# Altium PCB BalanceCar_CCD_Base.PcbDoc
Units mm, origin at the board's own origin, x right, y up, seen from the top; angles counter-clockwise.
Board outline 99 x 60 mm, 2 copper layers (Top Layer, Bottom Layer); 19 components, 44 nets, 132 pads, 10 vias.
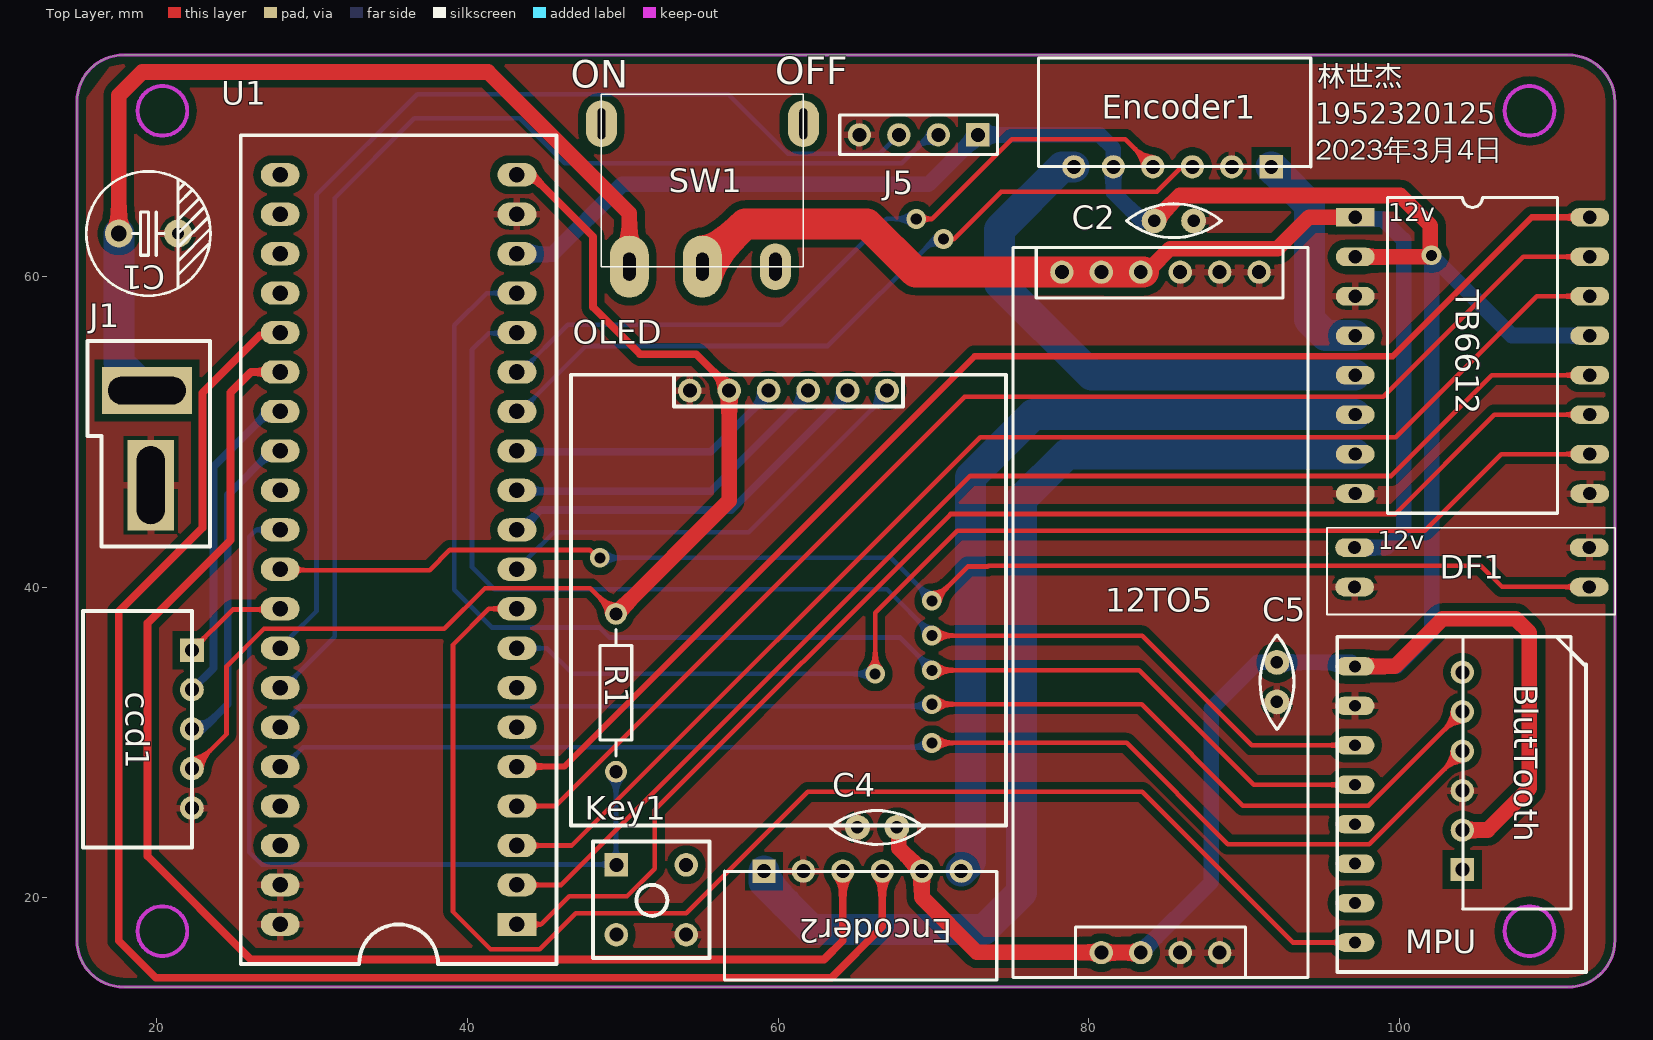
[diagram p0: Top Layer view]
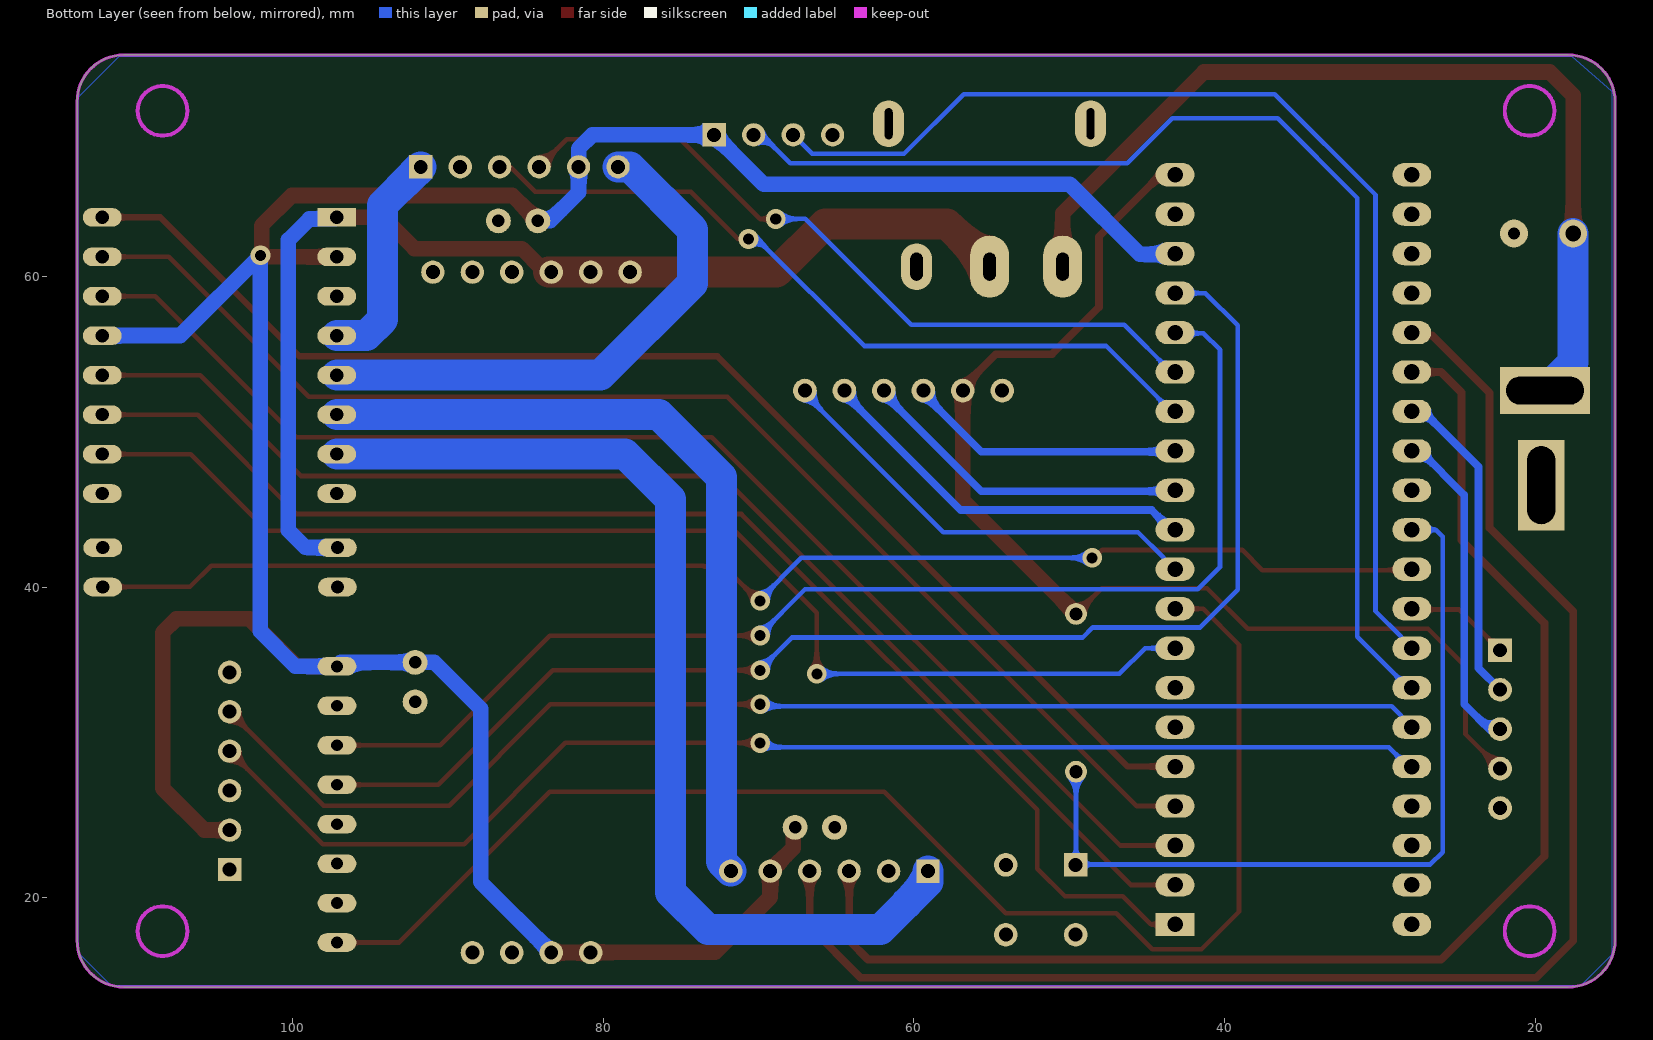
[diagram p1: Bottom Layer view, seen from below]

## Layer stack, top to bottom
Top Solder: solder mask 0.0102, Solder Resist, Dk 3.5
Top Layer: signal copper 0.0356
Dielectric1: dielectric 0.32, FR-4, Dk 4.8
Bottom Layer: signal copper 0.0356
Bottom Solder: solder mask 0.0102, Solder Resist, Dk 3.5

## Board outline
14.857,17.257 ccw(c17.857,17.257) 17.857,14.257 110.857,14.257 ccw(c110.857,17.257) 113.857,17.257 113.857,71.257 ccw(c110.857,71.257) 110.857,74.257 17.857,74.257 ccw(c17.857,71.257) 14.857,71.257
cut-out: 0,0 0.254,0 0.254,0.254 0,0.254

## Design rules (kind name [scope] priority, off if disabled: settings)
Clearance [All] p1: gap=0.254 ignorepadtopadclearanceinfootprint=FALSE
PlaneConnect [All] p1: planeconnectstyle=Relief reliefexpansion=0.508 reliefentries=4 reliefconductorwidth=0.454 reliefairgap=0.254
PolygonConnect [All] p1: connectstyle=Relief reliefconductorwidth=0.454 reliefentries=4 polygonreliefangle="90 Angle" airgapwidth=0.254
RoutingVias [All] p1: holewidth=0.6 width=1 viastyle="Through Hole" minholewidth=0.711 minwidth=1.27 maxholewidth=0.711 maxwidth=1.27
SolderMaskExpansion [All] p1: expansion=0.102 istentingtop=FALSE
Width [All] p1: maxlimit=2.5 minlimit=0.22 preferedwidth=1
29 further rules are at their usual default settings.

## Components (designator, comment, footprint, x,y, rotation, side; value= is the part's Value field where it differs from the comment)
12TO5 "稳压12T05" 稳压12T05 90.957,60.274 r270 top
BlutTooth "蓝牙模块" "HDR1X6 - XH弯" 104.038,21.819 r90 top
C1 "220uF35V" CAP-820uF-6.3V 17.551,62.763 r0 top
C2 "0.1UF" Cap-CP 86.741,63.576 r180 top
C4 "0.1UF" Cap-CP 65.1,24.536 r0 top
C5 "0.1UF" Cap-CP 92.1,32.614 r90 top
ccd1 "CCD巡线接口" CCD5 22.257,35.937 r270 top
DF1 "电池电压检测模块" "DF - 2" 97.104,42.545 r0 top
Encoder1 "右电机模块" "HDR1X6 - XH弯" 91.737,67.057 r180 top
Encoder2 "左电机模块" "HDR1X6 - XH弯" 59.08,21.717 r0 top
J1 "Header 2" "T HEAD" 19.611,46.561 r90 top
J5 "超声波接口" HDR1X4 72.847,69.113 r180 top
Key1 "SW-PB" KEY 49.323,21.869 r0 top
MPU "MPU6050模块" 6050new 108.376,26.264 r270 top
OLED "Header 6" OLED6 54.305,52.654 r0 top
R1 "Res2" AXIAL-0.4 49.555,33.198 r270 top value=10K
SW1 "SW-SPDT" SS12d11拨动电源开关 50.418,60.63 r0 top
TB6612 "电机驱动" TB6612DIP 97.143,63.805 r0 top
U1 "stm32f103c8t6" "PCBComponent_1 - duplicate" 43.18,18.288 r180 top

## Footprints (in the part's own frame and the unit in brackets; to place one, negate y for a bottom-side part, rotate by r counter-clockwise, add the part's x,y. Pads: shape width x height; smd on the part's side, far side on the other; paste and mask are expansions set on the pad)
6050new [mm]
  oval 1.2x2.5 hole 0.762: 1(-8.636,-11.246) 2(-6.096,-11.246) 3(-3.556,-11.246) 4(-1.016,-11.246)
  oval 1.2x2.5 hole 0.76: 5(1.524,-11.246) 6(4.064,-11.246) 7(6.604,-11.246) 8(9.144,-11.246)
  silkscreen extent -10.54,-12.39 11.05,3.61, body extent -9.91,-12.45 10.41,2.8, height 9.77
AXIAL-0.4 [mm] "Axial Device, Thru-Hole; 2 Leads; 0.4 in Pin Spacing"
  round 1.4 hole 0.85: 1(-5.08,0) 2(5.08,0)
  silkscreen extent -4.06,-1.02 4.06,1.02
CAP-820uF-6.3V [mm] "Φ8*11.5直插式电解电容"
  round 1.8 hole 1: 1(0,0)
  round 1.8 hole 0.8: 2(3.81,0)
  silkscreen extent -2.09,-4 5.9,4, body extent -1.97,-4.25 6.03,3.75, height 12
Cap-CP [mm] "直插型小瓷片电容"
  round 1.6 hole 0.8: 1(0,0) 2(2.54,0)
  silkscreen extent -1.78,-1.1 4.32,1.08, body extent -1.19,-0.51 3.73,0.59, height 4.76
CCD5 [mil]
  rect 60x60 hole 35.43: 1(0,0)
  round 60 hole 35.43: 2(100,0) 3(200,0) 4(300,0) 5(400,0)
  silkscreen extent -100,-276 500,0, body extent -90,-283 502,63, height 213
"DF - 2" [mm]
  oval 2.5x1.2 hole 0.85: 1(0,0) 2(0,-2.54) 3(15.1,-2.54) 4(15.1,0)
  silkscreen extent -1.78,-4.31 16.76,1.27, body extent -1.78,-4.32 16.76,1.27, height 8.2
HDR1X4 [mm] "Connector; Header; 4 Position"
  rect 1.5x1.5 hole 0.9: 1(0,0)
  round 1.5 hole 0.9: 2(2.54,0) 3(5.08,0) 4(7.62,0)
  silkscreen extent -1.27,-1.27 8.89,1.27, body extent -19.3,-18.29 26.42,0.07, height 27.41
"HDR1X6 - XH弯" [mm] "Connector; Header; 4 Position"
  rect 1.5x1.5 hole 0.9: 1(0,0)
  round 1.5 hole 0.9: 2(2.54,0) 3(5.08,0) 4(7.62,0) 5(10.16,0) 6(12.7,0)
  silkscreen extent -2.54,-7 14.99,0, body extent -2.39,-7.65 14.99,2.57, height 5.49
KEY [mil]
  rect 60x60 hole 35.43: 1(10,10)
  round 60 hole 35.43: 2(187.17,-167.17) 3(10,-167.17) 4(187.17,10)
  silkscreen extent -49,-226 246,69, body extent -80,-210 245,48, height 138
OLED6 [mil]
  round 60 hole 35.43: 1(0,0) 2(100,0) 3(200,0) 4(300,0) 5(400,0) 6(500,0)
  silkscreen extent -301,-1102 801,40, body extent -281,-1008 770,88, height 373
"PCBComponent_1 - duplicate" [mm]
  rect 2.5x1.5 hole 1: 1(0,0)
  oval 2.5x1.5 hole 1: 2(0,-2.54) 3(0,-5.08) 4(0,-7.62) 5(0,-10.16) 6(0,-12.7) 7(0,-15.24) 8(0,-17.78) 9(0,-20.32) 10(0,-22.86) 11(0,-25.4) 12(0,-27.94) 13(0,-30.48) 14(0,-33.02) 15(0,-35.56) 16(0,-38.1) 17(0,-40.64) 18(0,-43.18) 19(0,-45.72) 20(0,-48.26) 21(15.24,-48.26) 22(15.24,-45.72) 23(15.24,-43.18) 24(15.24,-40.64) 25(15.24,-38.1) 26(15.24,-35.56) 27(15.24,-33.02) 28(15.24,-30.48) 29(15.24,-27.94) 30(15.24,-25.4) 31(15.24,-22.86) 32(15.24,-20.32) 33(15.24,-17.78) 34(15.24,-15.24) 35(15.24,-12.7) 36(15.24,-10.16) 37(15.24,-7.62) 38(15.24,-5.08) 39(15.24,-2.54) 40(15.24,0)
  silkscreen extent -2.54,-50.8 17.78,2.54, body extent -3.23,-51.99 19.27,7.52, height 15.97
SS12d11拨动电源开关 [mm]
  oval 2x3 hole 0.5 slot 2 at 90 deg: 0(-1.8,9.2) 0(11.2,9.2)
  oval 2.5x4 hole 0.8 slot 1.8 at 90 deg: 1(0,0) 2(4.7,0)
  oval 2x3 hole 0.8 slot 1.8 at 90 deg: 3(9.4,0)
  silkscreen extent -1.8,0 11.2,11.1, body extent -1.77,-0.43 11.18,16.67, height 6.3
"T HEAD" [mm]
  rect 5.8x3 hole 1.8 slot 5 at 0 deg: 1(0,0)
  rect 3x5.8 hole 1.8 slot 5 at 90 deg: 2(6.096,0.254)
  silkscreen extent -3.94,-3.81 9.27,4.06, body extent -3.81,-3.81 9.14,4.06, height 10
TB6612DIP [mm]
  rect 2.5x1.2 hole 0.85: 1(0,0)
  oval 2.5x1.2 hole 0.85: 2(0,-2.54) 3(0,-5.08) 4(0,-7.62) 5(0,-10.16) 6(0,-12.7) 7(0,-15.24) 8(0,-17.78) 9(15.1,-17.78) 10(15.1,-15.24) 11(15.1,-12.7) 12(15.1,-10.16) 13(15.1,-7.62) 14(15.1,-5.08) 15(15.1,-2.54) 16(15.1,0)
  silkscreen extent 2.08,-19.05 13.02,1.27, body extent -2.83,-19.63 18.07,1.35, height 11.54
稳压12T05 [mm]
  round 1.5 hole 0.9: 1(0,0) 2(0,-2.54) 3(0,-5.08) 4(0,-7.62) 5(0,-10.16) 6(0,-12.7) 7(43.8,-10.16) 8(43.8,-7.62) 9(43.8,-5.08) 10(43.8,-2.54)
  silkscreen extent -1.6,-15.85 45.4,3.15, body extent -1.52,-15.75 45.21,3.05, height 20

## Part data
BlutTooth Encoder1 Encoder2: library part "Header 6", "不用焊", LatestRevisionDate=17-Jul-2002, LatestRevisionNote="Re-released for DXP Platform.", Publisher="Altium Limited"
C1: library part "CAPACITOR POL", "Capacitor"
C2 C4 C5: library part Cap, "Capacitor", LatestRevisionDate=17-Jul-2002, LatestRevisionNote="Re-released for DXP Platform.", PackageReference=RAD-0.3, Published=8-Jun-2000, Publisher="Altium Limited"
ccd1: library part "Header 5", "Header, 5-Pin", LatestRevisionDate=17-Jul-2002, LatestRevisionNote="Re-released for DXP Platform.", Publisher="Altium Limited"
DF1: library part 电阻分压测量电量
J1: "Header, 2-Pin", LatestRevisionDate=17-Jul-2002, LatestRevisionNote="Re-released for DXP Platform.", Publisher="Altium Limited"
J5: library part "Header 4", "Header, 4-Pin", LatestRevisionDate=17-Jul-2002, LatestRevisionNote="Re-released for DXP Platform.", Publisher="Altium Limited"
Key1: "Switch", LatestRevisionDate=17-Jul-2002, LatestRevisionNote="Re-released for DXP Platform.", PackageDescription="Switch; 2 Leads", PackageReference=SPST-2, Published=24-Mar-1999, Publisher="Altium Limited"
OLED: "Header, 6-Pin", LatestRevisionDate=17-Jul-2002, LatestRevisionNote="Re-released for DXP Platform.", Publisher="Altium Limited"
R1: "Resistor", LatestRevisionDate=17-Jul-2002, LatestRevisionNote="Re-released for DXP Platform.", PackageDescription="Axial Device, Thru-Hole; 2 Leads; 0.4 in Pin Spacing", PackageReference=AXIAL-0.4, Published=8-Jun-2000, Publisher="Altium Limited"
SW1: "单刀双掷开关"
TB6612: library part TB6612
U1: library part Component_1_1

## Via types
v1: diameter 1.27, hole 0.711, Top Layer to Bottom Layer, 10 vias

## Nets (pads, with @x,y where several pads share a name; then routed paths per layer and width w, separated by ;. In a path a pad name is that pad's centre, name@x,y a point inside that pad or via, vN(x,y) a via of type N, cw(c..) or ccw(c..) an arc to the next point about the centre after c; other vN are vias at no path point)
3.3V: U1.38
3V3: ccd1.4 OLED.2 R1.1 U1.20 | length 75.1
  Top Layer w0.3: ccd1.4 24.486,30.546 24.486,34.9 26.899,37.313 38.506,37.313 41.123,39.929 47.904,39.929 R1.1
  Top Layer w0.5: U1.20@43.357,66.497 43.498,66.357 44.286,66.357 48.082,62.56 48.082,58.016 51.107,54.991 54.724,54.991 OLED.2@57.057,52.657
  Top Layer w1: U1.20@43.129,66.548 43.307,66.548 U1.20@43.357,66.497 ; R1.1 56.845,45.568 OLED.2
5V: 12TO5.7 12TO5.8 BlutTooth.2 C2.2 C4.2 C5.2 Encoder1.5 Encoder2.5 J5.1 MPU.1 TB6612.2 TB6612.13 U1.18 | length 194.6
  Top Layer w1: C4.2 67.755,24.422 67.755,23.202 Encoder2.5 69.24,20.041 72.796,16.485 12TO5.7@81.102,16.485 ; 12TO5.7 12TO5.8 ; C2.2@84.125,63.5 C2.2 85.836,65.211 100.041,65.211 101.977,63.275 v1@101.977,61.35 ; MPU.1 99.7,34.9 102.757,37.957 107.477,37.957 108.357,37.077 108.357,27.057 105.659,24.359 BlutTooth.2@103.807,24.359 ; TB6612.2 101.892,61.265 v1@101.977,61.35 ; v1@101.977,61.277 v1@101.977,61.35 ; v1(102.057,61.357) 101.984,61.357 v1@101.977,61.35
  Bottom Layer w1: U1.18@43.18,61.417 45.441,61.417 49.962,65.938 69.672,65.938 J5.1 80.696,69.113 81.577,68.232 Encoder1.5 81.577,65.412 83.414,63.576 C2.2 ; 12TO5.8 87.884,21.021 87.884,32.182 90.856,35.154 C5.2 96.876,35.154 MPU.1 99.8,34.9 102.057,37.157 v1(102.057,61.357) 107.217,56.197 TB6612.13@112.243,56.197
12V: 12TO5.4 12TO5.5 12TO5.6 DF1.1 SW1.2 TB6612.1 | length 72.1
  Top Layer w1: 12TO5.4@83.515,60.274 83.65,60.274 83.9,60.524 83.958,60.524 85.222,61.789 92.142,61.789 94.17,63.817 TB6612.1@96.957,63.817
  Top Layer w2: SW1.2 57.872,63.384 65.724,63.384 68.824,60.285 78.562,60.285 12TO5.5@81.102,60.285 ; 12TO5.5@80.975,60.274 12TO5.4@83.515,60.274
  Bottom Layer w1: TB6612.1@96.97,63.805 TB6612.1 97.243,63.705 98.91,63.705 100.257,62.357 100.257,43.657 99.157,42.557 DF1.1@97.104,42.557
AO1: Encoder1.1 TB6612.4 | length 14.2
  Bottom Layer w2: Encoder1.1 94.199,64.595 94.199,57.215 95.217,56.197 TB6612.4@97.143,56.197
AO2: Encoder1.6 TB6612.5 | length 35.3
  Bottom Layer w2: Encoder1.6 78.279,67.057 74.257,63.035 74.257,59.557 80.157,53.657 97.13,53.657 TB6612.5
BO1: Encoder2.1 TB6612.7 | length 67.5
  Bottom Layer w2: Encoder2.1 59.08,21.031 62.154,17.957 73.257,17.957 75.657,20.357 75.657,45.657 78.577,48.577 TB6612.7@97.143,48.577
BO2: Encoder2.6 TB6612.6 | length 52
  Bottom Layer w2: Encoder2.6 72.39,22.327 72.39,47.09 76.417,51.117 TB6612.6@97.143,51.117
GND: 12TO5.1 12TO5.2 12TO5.3 12TO5.9 12TO5.10 BlutTooth.3 C1.2 C2.1 C4.1 C5.1 ccd1.5 DF1.2 DF1.4 Encoder1.2 Encoder2.2 J1.1 J5.4 Key1.2 MPU.2 OLED.1 TB6612.3 TB6612.8 TB6612.9 U1.19 U1.39 U1.40
NetJ1_2: C1.1 J1.2 SW1.1 | length 60.4
  Top Layer w1: C1.1 17.551,71.653 19.058,73.16 41.318,73.16 50.418,64.06 SW1.1
  Bottom Layer w2: C1.1 17.551,54.463 J1.2
PA0: Encoder2.4 U1.25 | length 99.2
  Top Layer w0.5: U1.25 27.749,56.197 26.631,56.197 22.936,52.502 22.936,43.815 17.551,38.43 17.551,17.247 19.937,14.861 63.426,14.861 66.7,18.136 Encoder2.4
PA1: Encoder2.3 U1.26 | length 88.2
  Top Layer w0.5: U1.26@27.889,53.848 26.06,53.848 24.74,52.527 24.74,43.028 19.406,37.694 19.406,22.682 26.054,16.034 62.948,16.034 64.16,17.247 Encoder2.3
PA2: ccd1.2 U1.27 | length 20.6
  Bottom Layer w0.5: ccd1.2 23.647,34.787 23.647,47.752 27.203,51.308 U1.27@27.889,51.308
PA3: ccd1.3 U1.28 | length 21.2
  Bottom Layer w0.5: ccd1.3 22.958,30.857 24.562,32.461 24.562,45.923 27.407,48.768 U1.28@27.889,48.768 ; U1.28@27.889,48.717 U1.28@28.117,48.717
PA4: U1.29
PA5: Key1.1 R1.2 U1.30 | length 52.6
  Bottom Layer w0.3: U1.30@27.889,43.688 26.391,43.688 25.959,43.256 25.959,22.936 26.746,22.149 Key1.1@49.555,22.149 ; Key1.1@49.555,22.145 R1.2 ; Key1.1@49.757,21.857 Key1.1@49.757,22.125
PA6: DF1.3 U1.31 | length 87.8
  Top Layer w0.3: U1.31@27.889,41.097 37.567,41.097 38.862,42.393 47.853,42.393 48.361,41.885 v1(48.514,41.885) ; v1(69.891,39.116) 70.002,39.116 72.212,41.326 73.482,41.326 73.533,41.377 105.232,41.377 106.591,40.017 DF1.3@112.204,40.017
  Bottom Layer w0.3: v1(48.514,41.885) 67.234,41.885 69.891,39.227 v1(69.891,39.116)
PA7: ccd1.1 U1.32 | length 6.7
  Top Layer w0.3: ccd1.1 24.877,38.557 U1.32@27.889,38.557
PA8: TB6612.16 U1.5 | length 83.8
  Top Layer w0.4: U1.5@43.129,28.448 46.228,28.448 72.637,54.857 99.557,54.857 108.505,63.805 TB6612.16
PA9: U1.6
PA10: U1.7
PA11: TB6612.10 U1.8 | length 78
  Top Layer w0.3: v1@66.117,34.417 v1(66.243,34.417) 66.243,38.354 71.526,43.637 101.625,43.637 106.553,48.565 TB6612.10
  Bottom Layer w0.3: U1.8 45.11,36.068 46.761,34.417 v1(66.243,34.417)
PA12: MPU.8 U1.9 | length 89.5
  Top Layer w0.3: U1.9 41.377,38.608 39.065,36.297 39.065,19.101 41.478,16.688 44.653,16.688 46.977,19.012 54.089,19.012 61.9,26.822 83.439,26.822 93.142,17.12 MPU.8
PA15: OLED.6 U1.10 | length 28.7
  Bottom Layer w0.3: U1.10 43.355,41.148 43.91,41.702 43.91,41.878 45.568,43.536 58.096,43.536 OLED.6@67.045,52.485
PB0: J5.3 U1.33 | length 72.5
  Bottom Layer w0.3: U1.33@27.889,36.068 28.064,36.068 28.619,36.622 28.619,36.798 30.277,38.456 30.277,65.253 36.758,71.734 56.79,71.734 60.63,67.894 66.548,67.894 J5.3
PB1: J5.2 U1.34 | length 76
  Bottom Layer w0.3: U1.34@28.029,33.389 31.445,36.805 31.445,65.049 36.576,70.18 43.357,70.18 46.253,67.285 67.945,67.285 69.774,69.113 J5.2
PB3: OLED.5 U1.11 | length 25.1
  Bottom Layer w0.5: U1.11 43.409,43.688 44.679,44.958 56.978,44.958 OLED.5@64.57,52.55
PB4: OLED.4 U1.12 | length 21.3
  Bottom Layer w0.5: U1.12@43.357,46.177 55.657,46.177 OLED.4@62.03,52.55
PB5: OLED.3 U1.13 | length 17.9
  Bottom Layer w0.5: U1.13@43.18,48.717 55.657,48.717 OLED.3@59.49,52.55
PB6: Encoder1.3 U1.14 | length 50.4
  Top Layer w0.3: v1(70.637,62.408) 71.298,62.408 74.346,65.456 84.379,65.456 85.98,67.057 Encoder1.3
  Bottom Layer w0.3: U1.14 U1.14@43.408,51.308 ; U1.14@43.357,51.257 U1.14@43.408,51.308 ; v1(70.637,62.408) 70.079,62.408 63.195,55.524 47.624,55.524 U1.14@43.408,51.308
  Bottom Layer w1: U1.14 43.129,51.257 U1.14@43.357,51.257
PB7: Encoder1.4 U1.15 | length 47.9
  Top Layer w0.3: v1(68.885,63.703) 69.905,63.703 75.035,68.834 82.341,68.834 Encoder1.4
  Bottom Layer w0.3: U1.15 43.408,53.848 46.456,56.896 60.173,56.896 66.98,63.703 v1(68.885,63.703)
PB8: MPU.3 U1.16 | length 79.1
  Top Layer w0.3: v1(69.891,36.881) 83.434,36.881 90.495,29.82 MPU.3
  Bottom Layer w0.3: U1.16@43.357,56.337 41.351,56.337 40.284,55.27 40.284,41.3 41.727,39.857 67,39.857 69.891,36.966 v1(69.891,36.881)
PB9: MPU.4 U1.17 | length 85.1
  Top Layer w0.3: v1(69.891,34.646) 83.236,34.646 90.602,27.28 MPU.4
  Bottom Layer w0.3: U1.17@43.129,58.928 41.224,58.928 39.141,56.845 39.141,39.827 41.565,37.403 48.488,37.403 49.137,36.754 67.843,36.754 69.891,34.706 v1(69.891,34.646)
PB10: BlutTooth.5 U1.35 | length 82.1
  Top Layer w0.3: v1(69.891,32.461) 83.388,32.461 89.916,25.933 97.993,25.933 BlutTooth.5
  Bottom Layer w0.3: U1.35@27.889,30.988 28.064,30.988 28.619,31.542 28.619,31.718 29.225,32.323 69.754,32.323 v1(69.891,32.461)
PB11: BlutTooth.4 U1.36 | length 81.9
  Top Layer w0.3: v1(69.891,29.972) 82.423,29.972 88.951,23.444 98.044,23.444 BlutTooth.4
  Bottom Layer w0.3: U1.36@28.029,28.309 29.413,29.693 69.35,29.693 69.629,29.972 v1(69.891,29.972)
PB12: TB6612.11 U1.1 | length 84.9
  Top Layer w0.3: U1.1@43.129,18.288 44.737,18.288 46.541,20.091 50.267,20.091 52.057,21.882 52.057,25.667 71.095,44.704 99.704,44.704 106.105,51.105 TB6612.11
PB13: TB6612.12 U1.2 | length 82.7
  Top Layer w0.3: U1.2@43.129,20.828 46.033,20.828 72.362,47.157 99.457,47.157 105.945,53.645 TB6612.12
PB14: TB6612.14 U1.3 | length 83.8
  Top Layer w0.3: U1.3@43.129,23.368 46.711,23.368 73,49.657 99.757,49.657 108.825,58.725 TB6612.14
PB15: TB6612.15 U1.4 | length 83.8
  Top Layer w0.3: U1.4@43.129,25.908 45.644,25.908 71.993,52.257 98.957,52.257 107.965,61.265 TB6612.15
PC13: U1.22
PC14: U1.23
PC15: U1.24
R: U1.37
VB: U1.21
pads on no net: BlutTooth.1 BlutTooth.6 Key1.3 Key1.4 MPU.5 MPU.6 MPU.7 SW1.0 SW1.3

## Polygon pours and split planes (outlines as drawn)
GND on Bottom Layer "NONET_L02_P001" (solid, remove dead copper, shelved, pour order 1): 17.602,74.143 111.176,74.143 113.817,71.501 113.817,16.51 111.684,14.376 17.043,14.376 15.037,16.383 15.037,71.882 15.062,71.907
GND on Top Layer "GND_L01_P002" (solid, remove dead copper, pour order 2): 17.475,74.143 17.551,74.219 111.608,74.219 113.69,72.136 113.69,16.231 111.912,14.453 16.612,14.453 15.113,15.951 15.113,71.044

## Keep-outs
Keep-Out Layer:
  circle w0.254: c108.357,70.657 r1.6
  circle w0.254: c108.357,17.857 r1.6
  circle w0.254: c20.357,70.657 r1.6
  circle w0.254: c20.357,17.857 r1.6
  lines w0.2: 14.857,17.257 ccw(c17.857,17.257) 17.857,14.257 110.857,14.257 ccw(c110.857,17.257) 113.857,17.257 113.857,71.257 ccw(c110.857,71.257) 110.857,74.257 17.857,74.257 ccw(c17.857,71.257) 14.857,71.257 14.857,17.257

## Silkscreen, mask and mechanical layers (free items; w line width, h text height)
Top Overlay:
  text "林世杰" at 94.691,71.806 h2.3
  text "OFF" at 59.817,71.78 h3
  text "ON" at 46.66,71.577 h3
  text "1952320125" at 94.564,69.393 h2.3
  text "2023年3月4日" at 94.564,67.057 h2.3
  text "12v" at 99.263,63.17 h2
  text "12v" at 98.603,42.037 h2